# Altium PCB PCBesp32.PcbDoc (part 3 of 3)
Units mil, origin at the board's own origin, x right, y up, seen from the top; angles counter-clockwise.
Board outline 2750 x 1000 mil, 4 copper layers (Top Layer, L2, L3, L4), stack 60.469 mil thick; 64 components, 73 nets, 299 pads, 157 vias.
Unrouted connection lines stored in the file: 1.
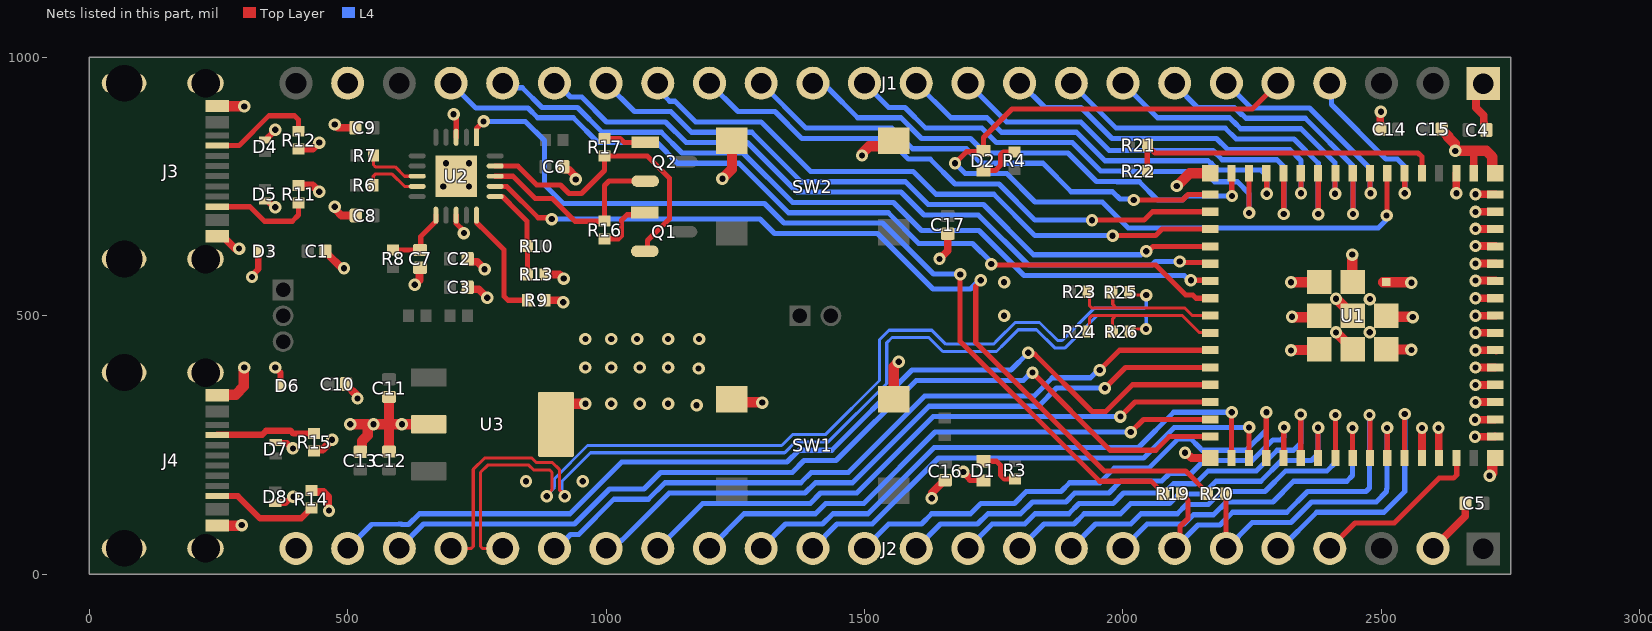
[diagram p4: the nets of this part, all layers, seen from the top]

## Via types
v1: diameter 24, hole 12, Top Layer to L4, tented both sides, 156 vias
v2: diameter 24, hole 12, Top Layer to L4, 1 vias

## Nets (pads, with @x,y where several pads share a name; then routed paths per layer and width w, separated by ;. In a path a pad name is that pad's centre, name@x,y a point inside that pad or via, vN(x,y) a via of type N, cw(c..) or ccw(c..) an arc to the next point about the centre after c; other vN are vias at no path point) (continued)
CON_ESP_USB_N: J2.20 R25.1 | length 1865.3
  Top Layer w6.03: J2.20@800,50 760.55,50 757.01,53.53 757.01,197.01 770.97,210.97 850.41,210.97 859.42,201.96 890.59,201.96 895.49,197.06 895.49,163.52 885,153.03 v1(885,151) ; R25.1@2013.07,545.59 2018.65,540 v1(2045,540)
  L4 w6.03: v1(885,151) 885,153.03 900.48,168.51 900.48,185.32 964.16,249 1339.51,249 1360.56,270.05 1424.27,270.05 1528.95,374.73 1528.95,453.8 1547.2,472.05 1630.34,472.05 1657.34,445.05 1749.37,445.05 1757.95,453.63 1791.37,487.05 1838.63,487.05 1873.63,452.05 1882.2,452.05 1944.67,514.51 2041.47,514.51 2045,518.05 v1(2045,540)
CON_ESP_USB_P: J2.21 R26.1 | length 1883.4
  Top Layer w6.03: J2.21@700,50 739.45,50 742.99,53.53 742.99,202.83 765.16,225 856.22,225 865.23,215.99 896.4,215.99 909.51,202.87 909.51,163.52 920,153.03 v1(920,151) ; R26.1@2013.33,469.44 2018.37,474.48 v1(2044.49,474.48)
  L4 w6.03: v1(920,151) 920,155.86 914.51,161.35 914.51,179.51 969.97,234.97 1345.32,234.97 1366.37,256.01 1430.08,256.01 1542.99,368.92 1542.99,447.99 1553.01,458.01 1624.53,458.01 1651.53,431.01 1755.18,431.01 1771.99,447.82 1797.18,473.01 1832.82,473.01 1867.82,438.01 1888.01,438.01 1950.49,500.49 2041.47,500.49 2045,496.95 v1@2045,475
DTR_FDTI: Q2.2 R16.1 U2.18 | length 398.9
  Top Layer w10: U2.18@785.41,770 820,770 830,760 863,727 895.84,727 939.92,682.93 R16.1@997,682.93 997,752 1005.6,760.6 Q2.2@1075.58,760.6
ESP_USB_N: R23.2 R25.2 U1.23 | length 301.8
  Top Layer w6.03: R23.2@1935,546.67 1935,520 1940.2,514.8 2120.04,514.8 2134.45,500.39 U1.23@2168.82,500.39
  Top Layer w6.23: R25.2@1980,545.03 1980,522.28 1987.38,514.9
ESP_USB_P: R24.2 R26.2 U1.24 | length 319
  Top Layer w6.03: R24.2@1935,467.38 1935,495 1940.77,500.77 1986.42,500.77 ; R26.2@1979.32,461.82 R26.2@1979.49,461.99 ; R26.2@1980,462.51 1980,494.35 1986.42,500.77 ; U1.24@2168.12,467.62 2147.38,467.62 2114.23,500.77 1986.42,500.77
  Top Layer w6.23: U1.24@2168.12,467.62 U1.24@2168.82,466.93
FDTI_USB_N: R6.2 U2.9 | length 114.3
  Top Layer w6.03: R6.2@549.51,752.47 549.51,770.22 553.41,774.12 586.11,774.12 609.91,750.32 610,750.32 610.35,750.32 U2.9@634.59,750.32
FDTI_USB_P: R7.2 U2.8 | length 111.9
  Top Layer w6.03: R7.2@550.01,810 550.01,791.68 553.54,788.15 591.92,788.15 610,770.07 610.07,770 U2.8@634.59,770
GND: C1.1 C2.1 C3.1 C4.1 C5.1 C6.1 C7.1 C8.1 C9.1 C10.1 C11.1 C12.1 C13.1 C14.1 C15.1 C16.1 C17.1 D1.1 D3.1 D4.1 D5.1 D6.1 D7.1 D8.1 J1.1 J1.23 J2.2 J2.24 J3.A1B12 J3.B1A12 J3.S1 J3.S2 J3.S3 J3.S4 J4.A1B12 J4.B1A12 J4.S1 J4.S2 J4.S3 J4.S4 R9.1 R11.1 R12.1 R13.1 R14.1 R15.1 SW1.3 SW1.4 SW2.3 SW2.4 U1.1 U1.2 U1.42 U1.43 U1.46 U1.47 U1.48 U1.49 U1.50 U1.51 U1.52 U1.53 U1.54 U1.55 U1.56 U1.57 U1.58 U1.59 U1.60 U1.61 U1.62 U1.63 U1.64 U1.65 U1.66 U1.67 U1.68 U1.69 U1.70 U1.71 U1.72 U1.73 U2.3 U2.13 U2.21 U3.2 U3.4 | length 3964.4
  Top Layer w10: v1@1006.21,330 v1(1010,330) ; v1(1179,398) v1@1181.68,395.32 ; U1.42@2578.27,224.8 U1.42@2578.39,224.93 ; v1@2578.39,282.85 v1(2578.52,282.97) ; v1(2610.51,283.11) v1@2611.12,282.5 ; U1.43@2611.12,225.41 U1.43@2611.73,224.8
  Top Layer w10.01: v1(705,890) 705,886.21 710,881.21 U2.3@710,845.41 ; U2.13@710.23,694.35 710.23,678.55 725,663.79 v1(725,660)
  Top Layer w12: v1(315,575) 315,578.25 327.2,590.45 D3.1@327.2,625 D3.1@327.2,630 ; D5.1@340,722.2 344.92,722.2 357.13,710 v1(360,710) ; D4.1@340.31,839.86 345.23,839.86 346.12,840.75 346.12,845.68 360,859.55 v1(360,860) ; D8.1@360,137.2 360.89,138.09 379.85,138.09 391.75,150 v1(395,150) ; v1(360,400) 370,390 D6.1@370,365 ; D7.1@360.71,254.57 361.6,253.68 382.28,253.68 392.47,243.49 v1(394.09,243.49)
  Top Layer w15: J3.B1A12@247.64,653.94 258.46,653.94 282.4,630 v1(290,630) ; v1@299.09,905.91 299.55,905.45 v1(300,905) ; R11.1@405,752.01 432.06,752.01 444.06,740 v1(445,740) ; R12.1@405,822.99 432.06,822.99 444.06,835 v1(445,835) ; R14.1@430,162.01 433.13,158.88 453.49,158.88 462.28,150.09 462.28,124.72 v1(464,123) ; R15.1@433.92,240.94 434.1,241.12 451.3,241.12 470,259.82 v1(470,260) ; C1.1@457.2,625 461.52,620.69 461.52,619.31 487.1,593.72 491.28,593.72 v1(493,592) ; v1(475,711) 476.72,709.28 476.72,705.22 487.94,694 C8.1@515.8,694 ; v1(475,870) 481.32,863.68 C9.1@515.3,863.68 ; C10.1@497.13,368 497.13,366.62 519,344.75 v1@519,342 ; v1(630,560) 638.85,568.85 638.85,591.65 C7.1@640,592.8 ; C3.1@732.2,553.62 734.47,551.35 753.65,551.35 v1(770,535) ; C2.1@732.2,610 732.2,608.62 736.52,604.31 750.69,604.31 v1(765,590) ; R9.1@882.01,530 913.63,530 v1(917.26,526.37) ; R13.1@882.01,580 910,580 v1(918,572) ; C6.1@916.95,788.32 916.95,786.94 921.26,782.63 928.13,782.63 939.69,771.06 939.69,765.57 v1(941.41,763.85) ; v1(1630,147) 1630,157.17 1654.62,181.8 C16.1@1656,181.8 ; v1(1645,610) 1661,626 C17.1@1661,658.59 ; v1(1691,198) 1705.15,183.85 1727.44,183.85 D1.1@1730,181.3 ; v1(2120,235) 2122.44,235 2132.53,224.9 2168.72,224.9 U1.64@2168.82,224.8 ; C14.1@2497.8,860.6 2497.8,893.39 v1(2499,894.6) ; U1.42@2578.39,224.93 v1@2578.39,282.85 ; J2.2@2600,50 2662.35,112.35 2662.35,131.31 2664.04,133 C5.1@2665,133 ; U1.43@2611.12,225.41 v1@2611.12,282.5 ; v1@2644.93,737.07 U1.2@2644.93,775.93 ; U1.1@2678.66,775.98 2678.66,814.98 ; v1@2680,267 v1(2681,266) ; v1(2681,299) U1.47@2719.39,299 ; v1(2682,400) U1.50@2720,400 ; v1(2682,433) 2682.23,433.23 2721.77,433.23 U1.51@2721.93,433.07 ; v1@2682.07,333.07 U1.48@2720,333.07 U1.48@2720.93,333.07 ; v1@2682.07,366.07 U1.49@2720.93,366.07 ; v1@2682.07,467.07 U1.52@2720.93,467.07 ; v1@2682.07,500.07 U1.53@2720.93,500.07 ; v1@2682.07,568.07 U1.55@2720.93,568.07 ; v1@2682.07,601.07 U1.56@2720.93,601.07 ; v1@2682.07,635.07 U1.57@2720.93,635.07 ; v1@2682.07,668.07 U1.58@2720.93,668.07 ; v1@2682.07,701.07 U1.59@2720.93,701.07 ; v1@2682.07,735.07 U1.60@2720.93,735.07 ; v1@2682.14,533.86 U1.54@2720,533.86 ; J1.1@2697,949 2683,935 2683,902.36 2697.91,887.45 2697.91,873.9 2698.69,873.11 2698.69,863.73 C4.1@2703,859.42 ; U1.62@2714.25,781.73 U1.62@2720,775.98 ; U1.46@2719.86,266.52 2719.34,266 v1(2681,266) ; U1.46@2720,266.14 2719.93,266.07 2681.07,266.07 v1(2681,266)
  Top Layer w20: J4.B1A12@247.64,94.09 294.09,94.09 v1(295,95) ; J4.A1B12@247.64,346.06 248.96,347.39 283.19,347.39 299.23,363.44 299.23,399.23 v1(300,400) ; J3.A1B12@247.64,905.91 248.09,905.45 v1@299.55,905.45 ; v1(505,290) v1@539.12,290 ; C13.1@524.71,236.94 526.08,236.94 527.89,238.75 527.89,257.89 539.12,269.12 539.12,289.23 549.23,289.23 v1(550,290) ; v1@549.23,290 v1(550,290) ; C12.1@580,237.2 580,285 575,290 ; C11.1@580,342.8 580,295 575,290 ; U3.2@656.97,290 v1(605,290) 575,290 ; U3.4@878.58,237.01 903.03,261.46 U3.4@903.03,290 903.03,305.55 927.48,330 v1(960,330) ; v1(1175,327) v1@1176.08,327 ; v1(1225,765) 1243.5,783.5 SW2.4@1243.5,838.58 ; SW1.4@1243.5,338.58 1249.32,332.77 1301.77,332.77 v2@1302,333 ; v2@1300.92,332 v2(1302,332) ; v1(1495,810) 1495.77,810.77 1495.77,814.88 1508.72,827.83 1545.75,827.83 SW2.3@1556.5,838.58 ; SW1.3@1556.5,338.58 1556.5,401.5 v1(1566,411) ; v1(2104,751) 2128.98,775.98 U1.63@2168.82,775.98 ; v1@2324.82,565 2325,565.18 v1@2325.18,565.18 ; v1(2325,433) 2325.77,433.77 2380.94,433.77 U1.73@2381.47,433.23 ; v1(2325,565) v1@2325.18,565.18 ; v1@2327.77,497.23 U1.72@2380.47,497.23 ; U1.71@2379.45,565.35 2379.27,565.18 v1@2325.18,565.18 ; v1(2412.2,467.86) 2412.2,467.64 2444.84,435 U1.70@2447,435 ; v1(2412.2,532.95) 2412.2,532.6 2444.8,500 U1.61@2445,500 ; v1(2443.7,618.3) 2443.7,573.06 U1.69@2447.23,569.53 ; U1.66@2503.53,564.77 2557.23,564.77 v1(2558,564) ; U1.68@2509.37,435.43 2510.09,434.72 2557.28,434.72 v1(2558,434) ; U1.67@2509.41,500.39 2511.51,498.3 2559.7,498.3 v1(2560.47,497.53) ; C15.1@2618.21,858.28 2629.27,847.23 2629.27,845.51 2642.23,832.54 2642.23,819.77 v1(2643,819) 2702.54,819 2714.25,807.28 U1.62@2714.25,781.73 ; v1(2709.25,190.49) 2709.25,191.58 2714.25,196.58 2714.25,219.06 U1.65@2720,224.8 ; v1(550,290) 575,290
  other v1: 845,180 955,180 1065,330 1120,330 2682,333 519,340 2682,366 960,400 1010,400 1065,400 1120,400 960,455 1010,455 1060,455 1120,455 1180,455 2682,467 2477.54,468.12 2327,498 1770,500 2682,500 2477.79,532.19 2682,534 1770,565 2682,568 2682,601 2682,635 2682,668 2682,701 2682,735 2645,737 685,750 735,750 690,795 735,795
GPIO0: R21.2 R22.2 U1.4 | length 622.9
  Top Layer w10: R22.2@2047.01,780 R21.2@2047.01,830 2047.01,828.82 2052.64,823.19 2053.82,823.19 2062.01,815 2571,815 2578.27,807.73 U1.4@2578.27,775.98
GPIO1: J1.4 U1.5 | length 325
  Top Layer w10: U1.5@2544.8,775.98 2545,775.79 v1(2545,737)
  L4 w10: J1.4@2400,950 2403.14,946.86 2403.14,908.86 2509,803 2531,803 2545,789 v1(2545,737)
GPIO2: D2.1 J1.5 U1.6 | length 1688.8
  Top Layer w10: v1(1675,795) 1697.43,817.43 1728.73,817.43 D2.1@1730,818.7 1730,845 1785,900 2250,900 J1.5@2300,950 ; v1(2510,694) 2510.67,694.67 2510.67,775.32 U1.6@2511.34,775.98
  L4 w10: v1(1675,795) 1695,775 1775,775 1830,720 1960,720 2010.28,669.72 2493.82,669.72 2507.32,683.22 2507.32,691.32 v1(2510,694)
GPIO3: J1.6 U1.7 | length 434.2
  Top Layer w10: U1.7@2477.87,775.98 2477.87,738.13 v1(2479,737)
  L4 w10: J1.6@2200,950 2248,902 2361,902 2478.07,784.93 2478.07,737.93 v1(2479,737)
GPIO4: J1.7 U1.8 | length 584.3
  Top Layer w10: v1(2445,697) U1.8@2445,775.39
  L4 w10: J1.7@2100,950 2100,947 2144,903 2215.28,903 2228.28,890 2230,890 2238,882 2352.72,882 2445,789.72 v1(2445,697)
GPIO5: J1.8 U1.9 | length 573.2
  Top Layer w10: v1(2410.35,736.2) U1.9@2410.35,775.39
  L4 w10: J1.8@2000,950 2067,883 2206.28,883 2214.28,875 2215,875 2228,862 2344.43,862 2410.35,796.08 v1(2410.35,736.2)
GPIO6: J1.9 U1.10 | length 719.3
  Top Layer w10: v1(2377.84,696.72) U1.10@2377.84,775.63
  L4 w10: J1.9@1900,950 1987,863 2198,863 2219,842 2331,842 2377.84,795.16 v1(2377.84,696.72)
GPIO7: J1.10 U1.11 | length 708.9
  Top Layer w10: U1.11@2344.02,775.98 2344.19,775.81 2344.19,737.15 v1(2344.36,736.97)
  L4 w10: J1.10@1800,950 1802,950 1849,903 1918.72,903 1978.72,843 2181,843 2202,822 2322.72,822 2344.36,800.35 v1(2344.36,736.97)
GPIO8: J1.11 U1.12 | length 848.2
  Top Layer w10: v1(2311,697) U1.12@2311,775.54
  L4 w10: J1.11@1700,950 1775,875 1918.43,875 1973.43,820 2174,820 2192,802 2298,802 2311,789 v1(2311,697)
GPIO9: J1.12 U1.13 | length 827.1
  Top Layer w10: U1.13@2277.09,775.98 2277.99,775.08 v1(2277.99,736.2)
  L4 w10: J1.12@1600,950 1667,883 1737,883 1765,855 1910.15,855 1965.15,800 2164.64,800 2169.64,795 2170.72,795 2183.72,782 2267,782 2277.99,771.01 v1(2277.99,736.2)
GPIO10: J1.13 U1.14 | length 946.7
  Top Layer w10: v1(2244,699) U1.14@2244,775.61
  L4 w10: J1.13@1500,950 1547,903 1578.57,903 1618.57,863 1727,863 1755,835 1901.86,835 1956.86,780 1996.57,780 1997.21,779.36 2157,779.36 2176.96,759.39 2221.36,759.39 2244,736.75 v1(2244,699)
GPIO11: J1.14 U1.15 | length 952.3
  Top Layer w10: U1.15@2210.16,775.98 2210.53,775.61 2210.53,732.04 v1(2210.91,731.66)
  L4 w10: J1.14@1400,950 1410.33,939.67 1430.33,939.67 1487,883 1570.28,883 1610.28,843 1705.28,843 1733.28,815 1893.58,815 1948.58,760 1988.28,760 1988.93,759.36 2031.36,759.36 2066.72,724 2115.18,724 2122.84,731.66 v1(2210.91,731.66)
GPIO12: J1.15 U1.16 | length 968.3
  Top Layer w10: v1@2020,725 v1(2021,724) 2115.18,724 2125.83,734.65 U1.16@2168.82,734.65
  L4 w10: J1.15@1300,950 1387,863 1553.28,863 1593.28,823 1697,823 1725,795 1845,795 1900,740 1980,740 1994,726 2019,726 v1(2021,724)
GPIO13: J1.16 U1.17 | length 1085.3
  Top Layer w10: v1(1940,685) 2040.94,685 2057.13,701.18 U1.17@2168.82,701.18
  L4 w10: J1.16@1200,950 1255,895 1326.72,895 1378.72,843 1545,843 1585,803 1627,803 1675,755 1760,755 1830,685 v1(1940,685)
GPIO14: J1.17 U1.18 | length 1203.2
  Top Layer w10: v1(1980,655) 2062.68,655 2075.39,667.72 U1.18@2168.82,667.72
  L4 w10: J1.17@1100,950 1100,938.18 1123.18,915 1133.28,915 1173.28,875 1300,875 1395.78,779.22 1594.07,779.22 1638.28,735 1750,735 1830,655 v1(1980,655)
GPIO15: J1.18 U1.19 | length 1313.1
  Top Layer w10: v1(2045,625) 2048.79,625 2058.04,634.25 U1.19@2168.82,634.25
  L4 w10: J1.18@1000,950 1055,895 1125,895 1165,855 1281.72,855 1377.5,759.22 1579.07,759.22 1623.28,715 1730,715 1827,618 2034.21,618 2041.21,625 v1(2045,625)
GPIO16: J1.19 U1.20 | length 1419.3
  Top Layer w10: v1(2110,605) 2112.11,602.89 2166.71,602.89 U1.20@2168.82,600.79
  L4 w10: J1.19@900,950 904.18,950 931.18,923 953,923 1001,875 1115,875 1155,835 1273.43,835 1369.22,739.22 1570.78,739.22 1615,695 1720,695 1817,598 2056.18,598 2063.18,605 v1(2110,605)
GPIO17: J1.20 U1.21 | length 1527.3
  Top Layer w10: v1(2131.34,568.66) 2167.48,568.66 U1.21@2168.82,567.32
  L4 w10: J1.20@800,950 808.73,941.27 837.73,941.27 876,903 944.72,903 992.72,855 1106.72,855 1146.72,815 1265.15,815 1360.93,719.22 1555.78,719.22 1610,665 1721.72,665 1808.72,578 2118.48,578 2127.82,568.66 v1(2131.34,568.66)
GPIO18: J1.21 U1.22 | length 1643.4
  Top Layer w10: v1(1745,600) 1747,598 2063.3,598 2121.3,540 2135,540 2141.14,533.86 U1.22@2168.82,533.86
  L4 w10: J1.21@700,950 748,902 848.72,902 867.72,883 936.43,883 984.43,835 1098.43,835 1138.43,795 1256.86,795 1352.65,699.22 1545.78,699.22 1605,640 1708.79,640 1745,603.79 v1(1745,600)
GPIO21: J2.19 U1.25 | length 1427.7
  Top Layer w10: v1(1955,395) 1993.46,433.46 U1.25@2168.82,433.46
  L4 w10: J2.19@900,50 904.18,50 931.18,77 947,77 1015,145 1081.72,145 1113.72,177 1376.72,177 1396.72,197 1468.43,197 1616.43,345 1828.18,345 1863.18,380 1937.14,380 1952.14,395 v1(1955,395)
GPIO26: J2.18 U1.26 | length 1313.8
  Top Layer w10: v1(1965,360) 2005,400 U1.26@2168.82,400
  L4 w10: J2.18@1000,50 1014.61,50 1030.35,65.73 1030.73,65.73 1122,157 1385,157 1405,177 1476.72,177 1624.72,325 1836.47,325 1871.47,360 v1(1965,360)
GPIO33: J2.17 U1.28 | length 1189.6
  Top Layer w10: v1(1995,305) 2023.07,333.07 U1.28@2168.82,333.07
  L4 w10: J2.17@1097.5,47.5 1187,137 1395,137 1415,157 1485,157 1633,305 v1(1995,305)
GPIO34: J2.16 U1.29 | length 1072.2
  Top Layer w10: v1(2015,275) 2039.61,299.61 U1.29@2168.82,299.61
  L4 w10: J2.16@1200,50 1267,117 1405,117 1425,137 1498.43,137 1636.43,275 v1(2015,275)
GPIO35: J2.15 U1.31 | length 1107.8
  Top Layer w10: U1.31@2210.16,224.8 2210.21,224.85 2210.21,313.25 v1(2210.25,313.29)
  L4 w10: J2.15@1300,50 1347,97 1418.72,97 1438.72,117 1506.72,117 1634.72,245 2030,245 2098.29,313.29 v1(2210.25,313.29)
GPIO36: J2.14 U1.32 | length 1000.3
  Top Layer w10: U1.32@2243.62,224.8 2243.81,224.99 2243.81,283.81 v1(2244,284)
  L4 w10: J2.14@1400,50 1447,97 1515,97 1643,225 2040,225 2099,284 v1(2244,284)
GPIO37: J2.13 U1.33 | length 1013.8
  Top Layer w10: U1.33@2277.09,224.8 2277.1,313.13 v1(2277.42,313.45)
  L4 w10: J2.13@1500,50 1547,97 1610,97 1630,117 1705,117 1725,137 1790,137 1813,160 1880,160 1897,177 1955,177 1983,205 2050,205 2107,262 2131.18,262 2147,246.18 2147,245.86 2152.86,240 2238.18,240 2277.42,279.24 v1(2277.42,313.45)
GPIO38: J2.12 U1.34 | length 879.1
  Top Layer w10: U1.34@2310.55,224.8 2311.16,225.41 2311.16,283.43 v1(2311.77,284.04)
  L4 w10: J2.12@1600,50 1647,97 1718.72,97 1738.72,117 1801.72,117 1824.72,140 1889.72,140 1906.72,157 1972.72,157 1995.86,180.14 2074.86,180.14 2089.72,195 2131.72,195 2156.72,220 2250.15,220 2290.15,260 2305.92,260 2311.77,265.86 v1(2311.77,284.04)
GPIO39: J2.11 U1.35 | length 867.7
  Top Layer w10: U1.35@2344.02,224.8 v1(2344.02,308.98)
  L4 w10: J2.11@1700,50 1747,97 1810,97 1830,117 1895,117 1915,137 1981,137 2001,157 2080,157 2098,175 2140,175 2165,200 2258.43,200 2298.43,240 2330,240 2344.02,254.02 v1(2344.02,308.98)
GPIO40: J2.10 U1.36 | length 763.5
  Top Layer w10: v1@2377,284 v1(2377.48,283.52) U1.36@2377.48,224.8
  L4 w10: J2.10@1800,50 1847,97 1905,97 1925,117 1995,117 2015,137 2090,137 2108,155 2155,155 2180,180 2266.72,180 2306.72,220 2365,220 2377.48,232.48 v1(2377.48,283.52)
GPIO41: J2.9 U1.37 | length 755
  Top Layer w10: U1.37@2410.94,224.8 2410.94,307.94 v1(2411,308)
  L4 w10: J2.9@1900,50 1947,97 2015,97 2035,117 2105,117 2123,135 2165,135 2190,160 2275,160 2315,200 2395,200 2411,216 v1(2411,308)
GPIO42: J2.8 U1.38 | length 652.8
  Top Layer w10: v1(2444,283) 2444.2,282.8 2444.2,225.01 U1.38@2444.41,224.8
  L4 w10: J2.8@2000,50 2047,97 2118.72,97 2136.72,115 2175,115 2200,140 2290,140 2330,180 2433,180 2444,191 v1(2444,283)
GPIO45: J2.5 U1.41 | length 525.8
  Top Layer w10: U1.41@2544.8,224.8 2544.9,224.9 2544.9,309.9 v1(2545,310)
  L4 w10: J2.5@2300,50 2305,50 2375,120 2505,120 2545,160 v1(2545,310)
GPIO46: J2.4 U1.44 | length 337.5
  Top Layer w10: J2.4@2400,50 2449,99 2524.72,99 2611.72,186 2639.74,186 2645.6,191.86 2645.6,224.4 U1.44@2645.2,224.8
GPIO47: J2.23 U1.27 | length 1894
  Top Layer w10: v1(1816.59,428.41) 1819.27,425.73 1829.27,425.73 1940,315 1966.82,315 2018.35,366.54 U1.27@2168.82,366.54
  L4 w10: J2.23@500,50 546,96 599.12,96.99 cw(c600,50) 609.64,96 617.72,96 638.72,117 930.43,117 1030.43,217 1350,217 1373,240 1436.72,240 1591.72,395 1783.18,395 v1(1816.59,428.41)
GPIO48: J2.22 U1.30 | length 1782.6
  Top Layer w10: v1(1825,390) 1975,240 2063.46,240 2089.61,266.14 U1.30@2168.82,266.14
  L4 w10: J2.22@600,50 647,97 938.72,97 1006.72,165 1073.43,165 1105.43,197 1360,197 1383,220 1445,220 1600,375 1807.14,375 1822.14,390 v1(1825,390)
NetC7_2: C7.2 R8.2 U2.11 | length 124.8
  Top Layer w10: R8.2@587.93,627.01 588.02,627.11 639.9,627.11 C7.2@640,627.2
  Top Layer w10.01: C7.2@641.37,634.01 641.37,653.37 668,680 670.63,682.63 U2.11@670.63,694.59
NetD1_2: D1.2 R3.1 | length 85.5
  Top Layer w10: D1.2@1730,218.7 1755.3,218.7 1763,211 1763,192 1771,184 R3.1@1790,184
NetD2_2: D2.2 R4.1 | length 86.9
  Top Layer w10: D2.2@1730,781.3 1753.51,781.3 1762.74,790.53 1762.74,811.15 1768.6,817.01 R4.1@1790,817.01
NetJ3_A5: J3.A5 R12.2 | length 206.7
  Top Layer w10: J3.A5@247.64,829.13 289.67,829.13 347.53,887 397.14,887 405,879.14 R12.2@405,857.01
NetJ3_B5: J3.B5 R11.2 | length 196.9
  Top Layer w10: J3.B5@247.64,711.02 311.27,711.02 339.29,683 393,683 405,695 R11.2@405,717.99
NetJ4_A5: J4.A5 R15.2 | length 192.7
  Top Layer w12: J4.A5@247.64,270 334.81,270 342.28,277.46 389.61,277.46 395.06,272.01 R15.2@435,272.01
NetJ4_B5: J4.B5 R14.2 | length 209
  Top Layer w12: J4.B5@247.64,151.18 247.73,151.09 287.6,151.09 330.37,108.32 410.32,108.32 424.19,122.18 424.19,123.36 428.82,127.99 R14.2@430,127.99
NetQ1_1: Q1.1 R16.2 | length 116.8
  Top Layer w10: R16.2@997,648.91 1024.14,648.91 1030,654.77 1030,685 1040.31,695.31 1070.5,695.31 Q1.1@1075,699.8
NetQ1_2: Q2.1 R17.2 | length 97.5
  Top Layer w10: R17.2@997,843.01 1026.99,843.01 1035,835 1075.18,835 Q2.1@1075.58,835.4 Q2.1@1091.03,835.4
NetR9_2: R9.2 U2.15 | length 231.7
  Top Layer w10: U2.15@749.37,694.59 749.37,680.63 770,660 802.23,627.77 802.23,537.77 810,530 R9.2@852.04,530
RTS_FDTI: Q1.2 R17.1 U2.19 | length 583.6
  Top Layer w10: U2.19@785.41,789.68 829.32,789.68 830,789 866,753 912,753 928.15,736.85 952.6,736.85 997,781.25 R17.1@997,808.99 1079.78,808.99 1122.35,766.41 1122.35,687.5 1080.26,645.4 1080.26,630.26 Q1.2@1075,625
RXD_FDTI: R19.2 U2.1 | length 1777.5
  Top Layer w10: U2.1@749.37,845.41 749.37,862.37 v1(763,876) ; v1(1685,580) 1685,450 1955,180 2054.5,180 2072.15,162.35 2073.33,162.35 2078.96,156.72 R19.2@2078.96,155.54
  L4 w10: v1(763,876) 843.5,876 880.59,838.91 880.59,753.41 917,717 1306.58,717 1344.36,679.22 1535,679.22 1633.36,580.86 1684.14,580.86 v1(1685,580)
TXD_FDTI: R20.2 U2.17 | length 1712.4
  Top Layer w10: U2.17@796.94,750.32 807.97,750.32 868.61,689.68 892.32,689.68 v1(895,687) ; v1(1725,568.57) 1725,567.14 1715,557.14 1715,448.28 1963.28,200 2120.72,200 2164,156.72 R20.2@2164,155.54
  L4 w10: v1(895,687) 1298,687 1325.78,659.22 1525,659.22 1632.22,552 1704.82,552 1721.39,568.57 v1(1725,568.57)
U0RXD: J2.6 R20.1 U1.40 | length 646.1
  Top Layer w10: J2.6@2197,48 2199.01,50.01 2199.01,154.55 R20.1@2198.02,155.54 ; v1(2511,283) 2511.17,282.83 2511.17,224.97 U1.40@2511.34,224.8
  L4 w10: J2.6@2200,50 2250,100 2325,100 2365,140 2490,140 2510,160 2510,165 2511,166 v1(2511,283)
U0TXD: J2.7 R19.1 U1.39 | length 773.7
  Top Layer w10: J2.7@2099,49 2110.33,60.33 2110.33,92.33 2126,108 2126,142.52 2119.79,148.73 2118.61,148.73 2112.98,154.36 R19.1@2112.98,155.54 ; v1(2477,308) 2477.87,307.13 U1.39@2477.87,224.8
  L4 w10: J2.7@2100,50 2145,95 2185.08,95 ccw(c2185.03,105) 2187.62,95.34 2212.28,120 2316.72,120 2356.72,160 2470,160 2477,167 v1(2477,308)
"VBUS _SENSE": R10.1 R13.2 U2.16 | length 179.6
  Top Layer w10: U2.16@785.41,730.63 799.37,730.63 830,700 847.03,682.97 847.03,655.96 847.04,635.95 R10.1@847.99,635 R13.2@847.99,585.12
pads on no net: J1.24 J3.A8 J3.B8 J4.A8 J4.B8 U2.2 U2.4 U2.5 U2.6 U2.7 U2.14

## Polygon pours and split planes (outlines as drawn)
+3v3_FDTI on Top Layer "+3V3_FDTI_L01_P007" (solid, pour order 7): 599.61,582.39 599.36,582.13 566.87,582.13 541,608 541,678.53 538.36,681.17 538.36,707.24 566.55,707.24 598,738.69 598,739 610,739 610,695 625,695 631,689 631,676 606,651 569.97,651 570.03,611.47 576.53,604.96 599.61,604.96
GND on Top Layer "GND_L01_P015" (solid, pour order 15): 1317,342 1305,354 1279,354 1279,476 1272,469 825,469 709.97,353.97 550.66,353.97 550.66,309.34 550.98,309.02 487.39,309.02 487.39,282.61 497,273 497,224 498.46,225.46 593.31,225.46 593.31,229 868.53,229 868.53,226.98 1247.98,226.98 1250,229 1250,306 1316.62,306 1317,305.62 1317,313
GND on Top Layer "GND_L01_P010" (solid, pour order 10): 2298,636 2298,392 2300,394 2587,394 2587,635 2586,636 2296,636
+5V_VBUS2 on Top Layer "+5V_VBUS2_L01_P009" (solid, pour order 9): 387.51,352.67 474.48,352.67 474.48,398.52 401,472 355.15,472 349,446 388.71,406.29 388.71,349.01 388.78,348.95 389.02,348.95
+5V_VBUS1 on Top Layer "+5V_VBUS1_L01_P008" (solid, pour order 8): 434.65,530.18 434.65,638.65 434.18,638.18 346,638.18 346,530.18
+3v3 on Top Layer "+3V3_L01_P004" (solid, pour order 4): 2520.42,863.69 2520.38,863.73 2520.38,873.95 2532.79,873.95 2532.83,873.99 2532.64,874.18 2532.64,912.85 2573.8,912.85 2589.4,897.24 2588.92,896.76 2588.92,874.24 2594.1,874.24 2594.1,847.49 2520.46,847.49 2520.38,847.41 2520.3,847.49 2520.3,863.41
+3v3_FDTI on Top Layer "+3V3_FDTI_L01_P001" (solid, pour order 1): 894.41,775 867,775 867,813.09 829.5,813.09 829.5,842.5 842,855 894.41,855
+5v on Top Layer "+5V_L01_P003" (solid, pour order 3): 434,520 560,394 621,394 621,401 620,402 698,402 698,359 620,359 620,365 540,365 425,480 354,480 354,520
+3v3_REG on Top Layer "+3V3_REG_L01_P002" (solid, pour order 2): 692,220 620,220 620,215 506.23,215 506.23,168 494,163 485.5,153 485.5,141.5 486,141 492,135 592,135 602,145 602,179 692,179
GND on L2 "GND_L02_P018" (solid, pour order 18): 2737,11 2737,987 14,987 9,982 9,11 2729,11 2736,18
+3v3 on L2 "+3V3_L02_P017" (solid, pour order 17): 2729.13,16.08 2729.13,980.87 2728,982 955,982 955,781 956,780 1047,780 1134,693 1138,697 1412,697 1412,481 1415,478 1455,478 1455,698 1456,699 1822,699 1858,735 2006,735 2070,799 2071,798 2565,798 2565,751 2626,690 2625,689 2625,199 2479,199 2358,78 2358,16.08
GND on L3 (split plane): 2729.9,20.1 20.1,20.1 20.1,979.9 2729.9,979.9

## Silkscreen, mask and mechanical layers (free items; w line width, h text height)
Board Layer Stack Top Overlay:
  text "J1" at 2370,850 h40
  text "USER" at 1710,690 h40
  text "BOOT/USR" at 1258.94,570.5 h40
  text "USB1" at 450,550 h30
  text "UART" at 16.37,531.82 h40
  text "REG" at 1210,490 h40
  text "+3V3" at 1484.99,490.26 h40
  text "+5V" at 441.39,481.78 h40
  text "ESP" at 17.86,429.89 h40
  text "USB2" at 449.34,415.54 h40
  text "RESET" at 1322.58,391.15 h40
  text "POWER" at 1704.43,259.53 h40
  text "J2" at 2370,130 h40
Bottom Overlay:
  text "IO4" at 2121.03,878.63 h40 r90
  text "IO5" at 2021.17,877.01 h40 r90
  text "IO3" at 2216.06,877.01 h40 r90
  text "IO2" at 2315.92,877.01 h40 r90
  text "IO12" at 1318.95,875.4 h40 r90
  text "IO11" at 1415.59,875.4 h40 r90
  text "IO7" at 1815.02,875.4 h40 r90
  text "IO6" at 1926.15,875.4 h40 r90
  text "IO1" at 2419,875.4 h40 r90
  text "IO0" at 2518.85,875.4 h40 r90
  text "3V" at 2615.49,875.4 h40 r90
  text "IO15" at 1019.38,873.79 h40 r90
  text "IO14" at 1122.46,873.79 h40 r90
  text "IO13" at 1223.92,873.79 h40 r90
  text "IO17" at 818.05,872.18 h40 r90
  text "IO16" at 922.74,872.18 h40 r90
  text "IO10" at 1520.28,872.18 h40 r90
  text "IO9" at 1620.13,872.18 h40 r90
  text "IO8" at 1713.55,872.18 h40 r90
  text "IO18" at 713.36,870.57 h40 r90
  text "NC" at 421.84,867.35 h40 r90
  text "GND" at 516.87,867.35 h40 r90
  text "5V" at 616.73,867.35 h40 r90
  text "GND" at 2716.96,867.35 h40 r90
  text "<---PIN1--->" at 2715.95,738.35 h40 r90
  text "10-10-2026" at 2130,530 h40
  text "BTECH 3RD YEAR" at 2230,450 h40
  text "2026 KARIVEMULA LOKESH" at 2370,350 h40
  text "IO42" at 2014.86,274.84 h40 r90
  text "TXD" at 2117.37,274.84 h40 r90
  text "IO41" at 1914.65,273.69 h40 r90
  text "3V3" at 2716.06,273.85 h40 r90
  text "RXD" at 2218.73,271.39 h40 r90
  text "GND" at 410,270 h40 r90
  text "IO47" at 510,270 h40 r90
  text "IO48" at 610,270 h40 r90
  text "USB-" at 710,270 h40 r90
  text "USB+" at 810,270 h40 r90
  text "IO21" at 910,270 h40 r90
  text "IO26" at 1010,270 h40 r90
  text "IO33" at 1110,270 h40 r90
  text "IO34" at 1210,270 h40 r90
  text "IO35" at 1310,270 h40 r90
  text "IO36" at 1410,270 h40 r90
  text "IO37" at 1530,270 h40 r90
  text "IO38" at 1630,270 h40 r90
  text "IO40" at 1806.38,270.24 h40 r90
  text "IO45" at 2310.88,270.24 h40 r90
  text "IO46" at 2410,270 h40 r90
  text "EN" at 2514.75,270.24 h40 r90
  text "GND" at 2612.66,270.24 h40 r90
  text "IO39" at 1716.53,267.93 h40 r90
Top Solder:
  drawing of 15 lines, arcs and shapes, not listed
BOARD SHAPE:
  lines w6: 0,0 2744.06,0 ; 1.7,1.7 1.7,1001.73 1.72,1001.72 2745.48,1001.72 2745.1,1001.34 2745.1,994.9 2745.1,0.26

## Text inside footprints (layer, text, board x,y; h text height)
J1: Bottom Overlay "1" at 2691.75,1021.02 h40 r270
J2: Bottom Overlay "1" at 2676,-40 h40 r270